# Altium PCB BMS-v1.1.PcbDoc (part 1 of 2)
Units mil, origin at the board's own origin, x right, y up, seen from the top; angles counter-clockwise.
Board outline 1574.8 x 1574.8 mil, 2 copper layers (Top Layer, Bottom Layer), stack 34 mil thick; 76 components, 45 nets, 204 pads, 110 vias.
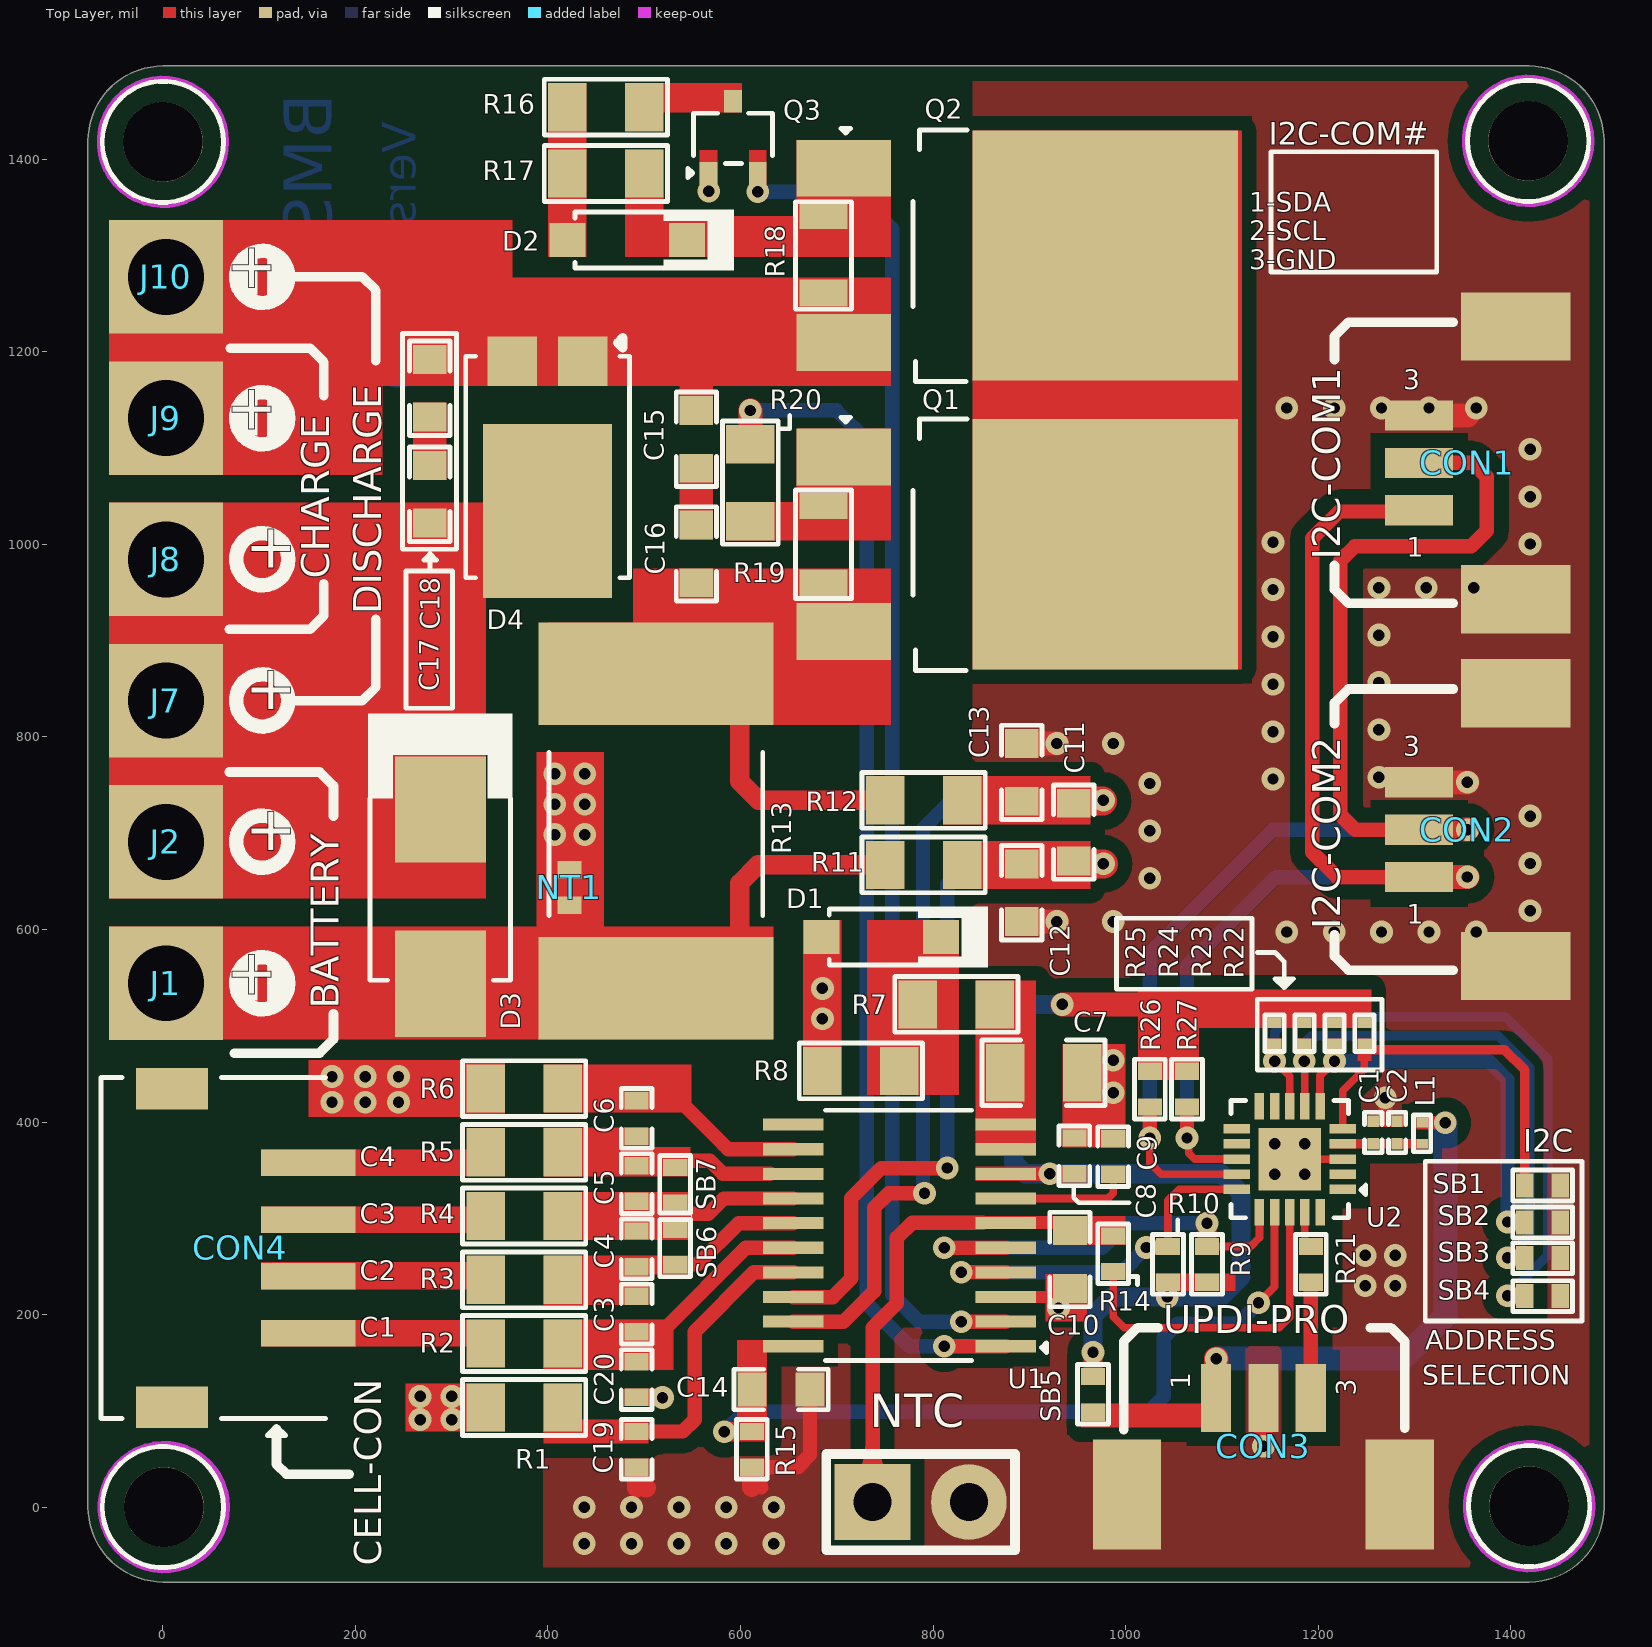
[diagram p0: Top Layer view]
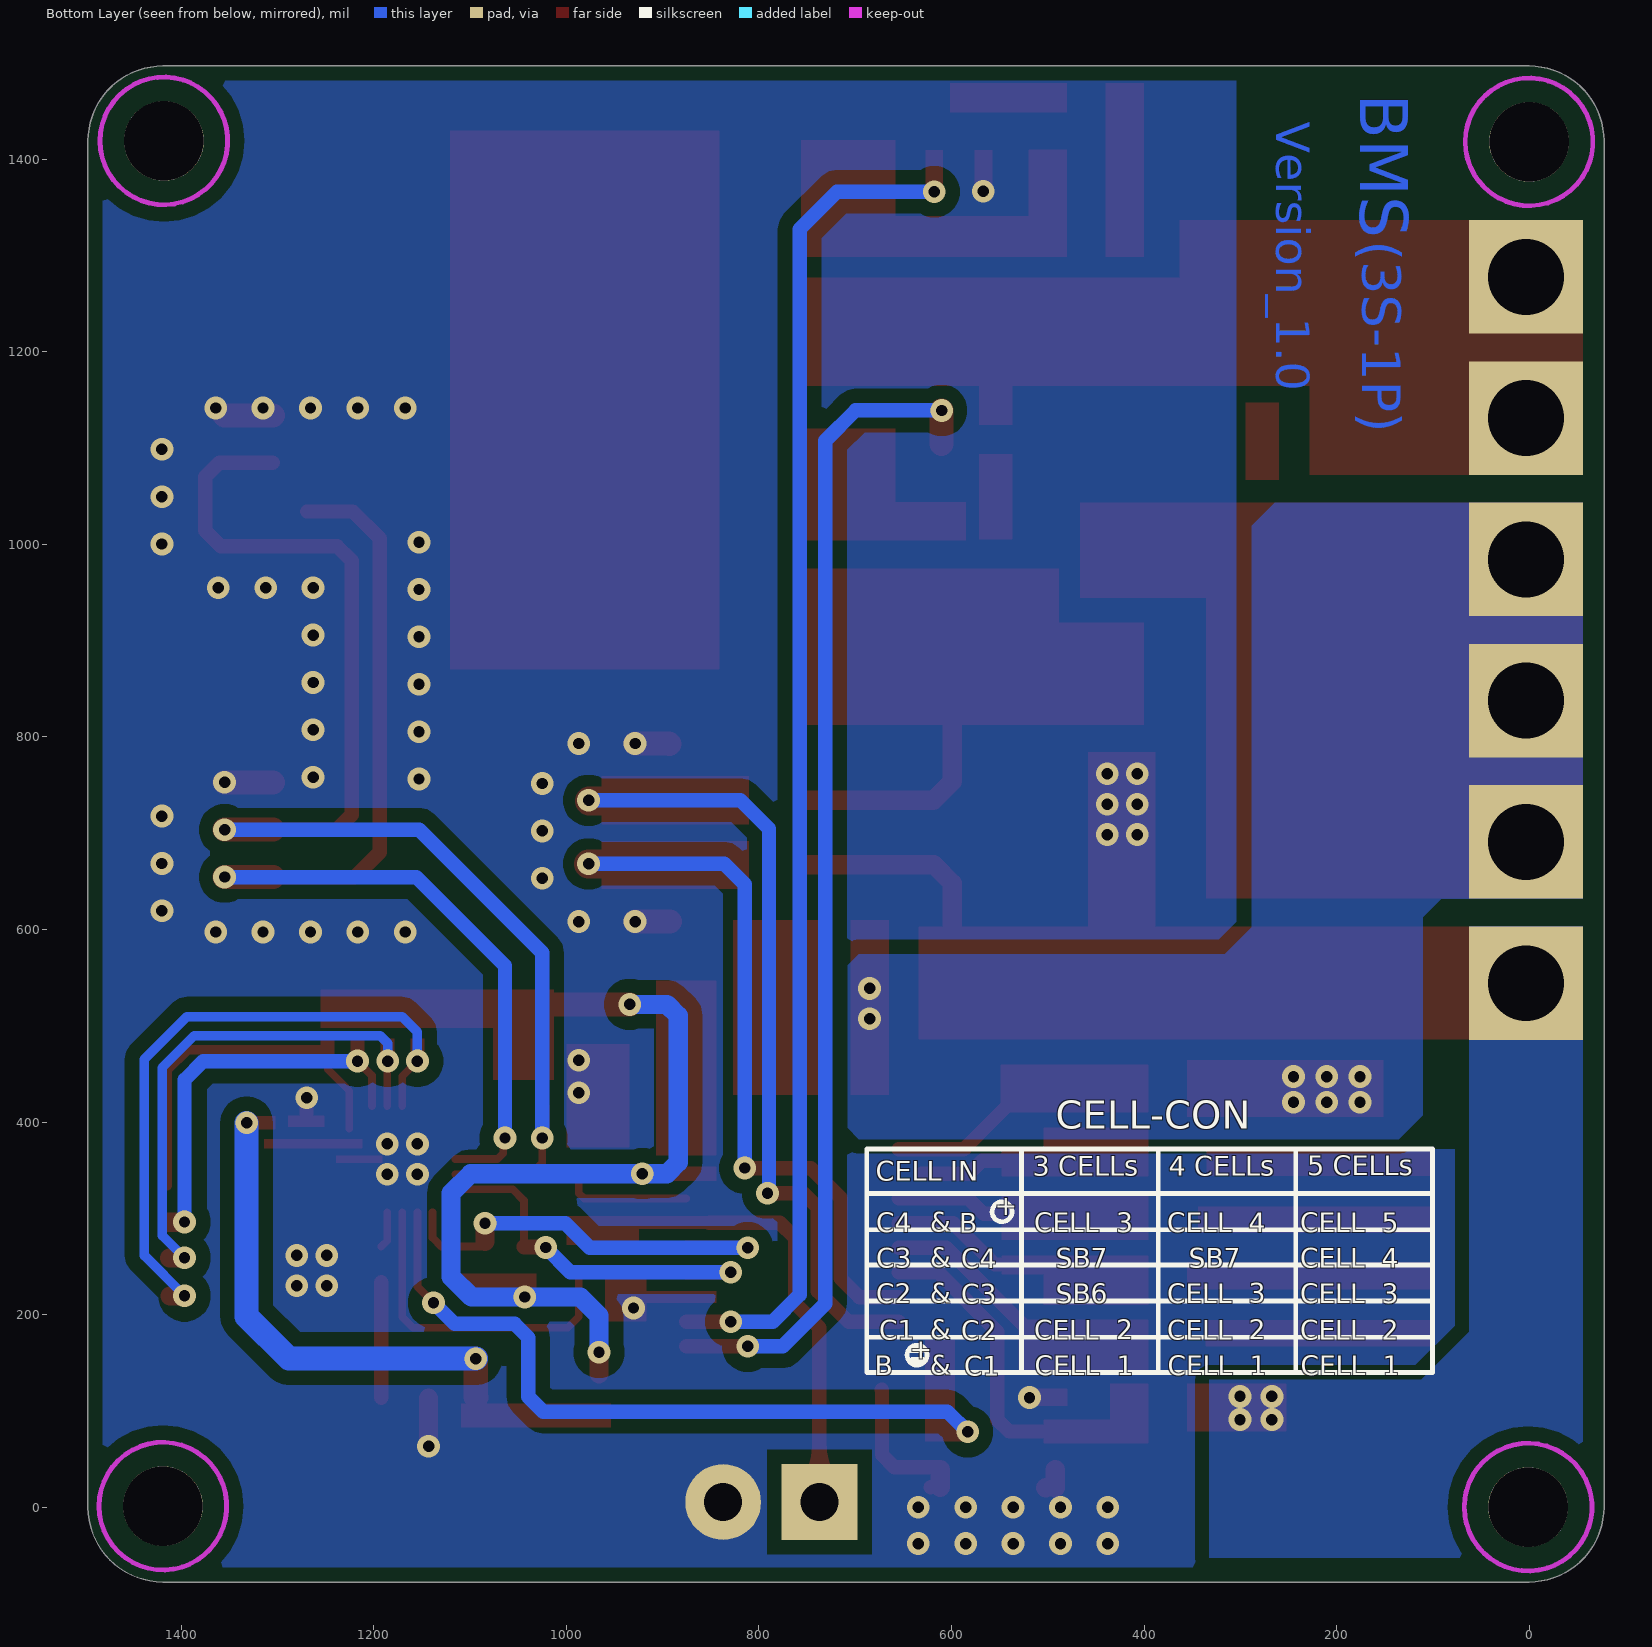
[diagram p1: Bottom Layer view, seen from below]
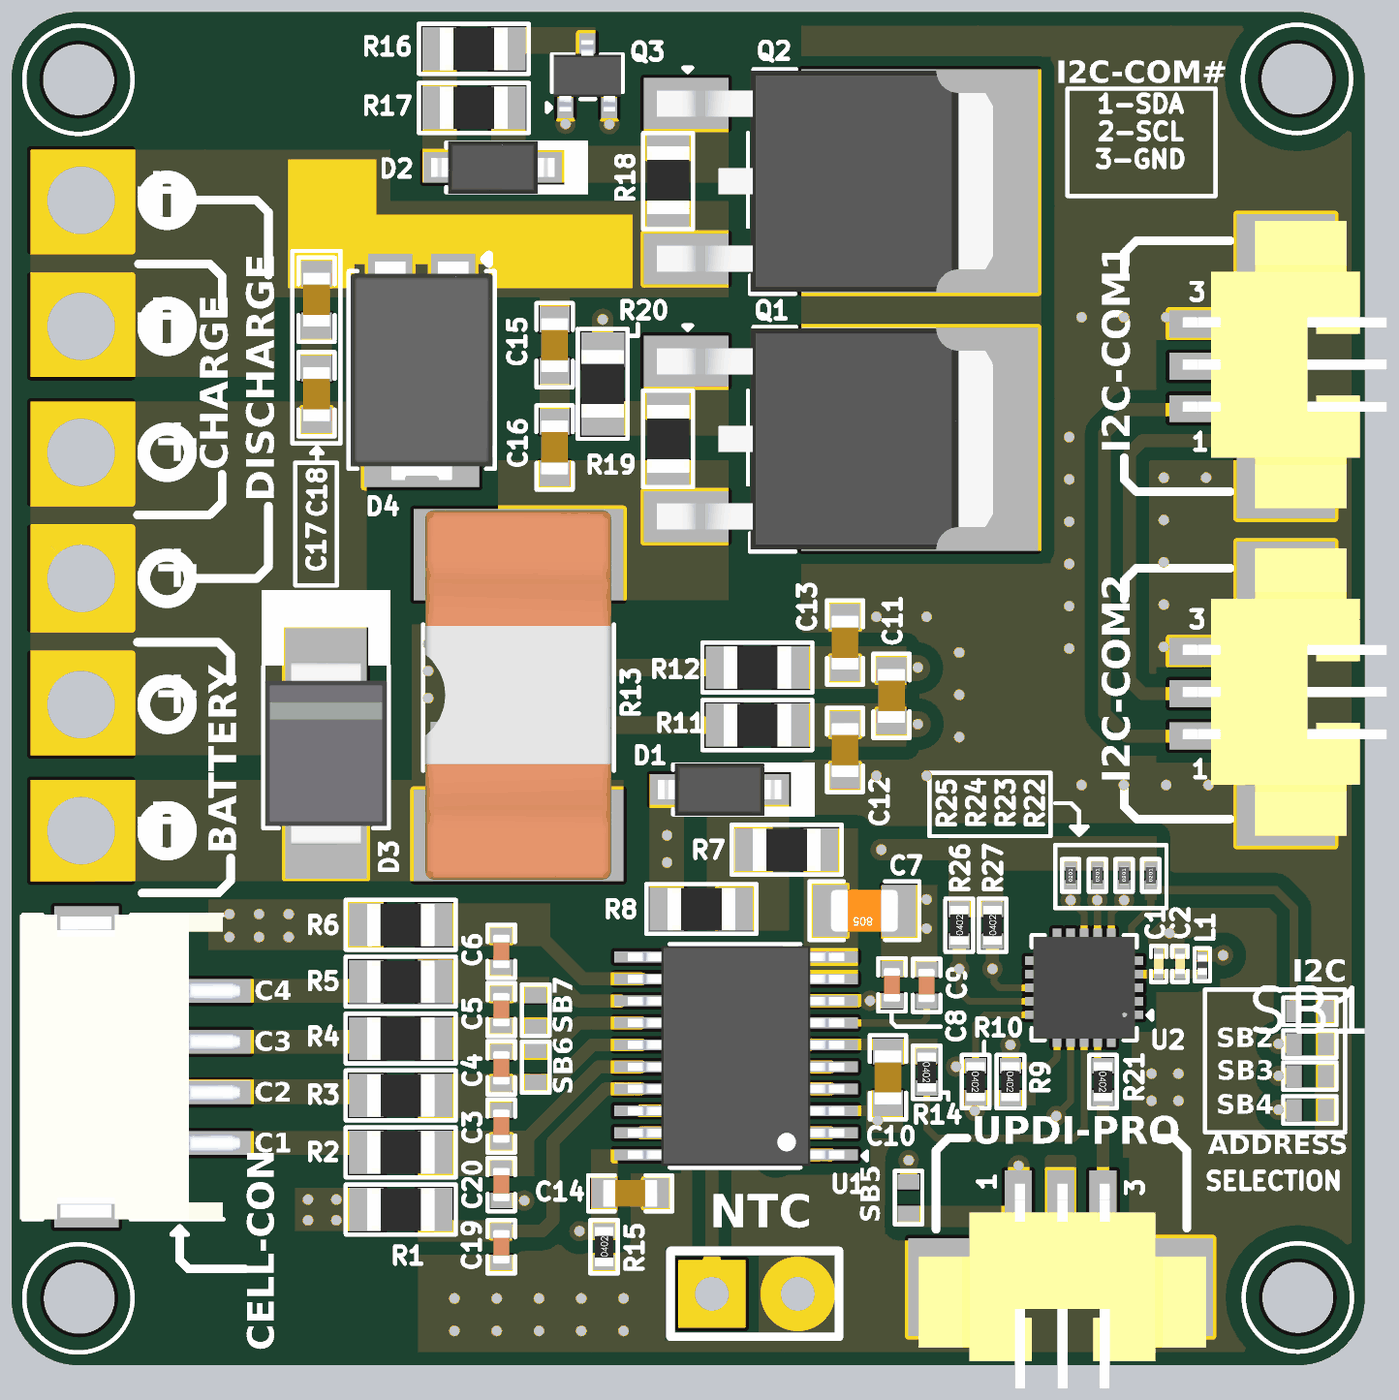
[diagram p2: 3D render of the assembled board from above, using the file's embedded part models]

## Layer stack, top to bottom
Top Solder: solder mask 3, Solder Resist, Dk 3.5
Top Layer: signal copper 9
Dielectric 1: dielectric 16, FR-4, Dk 4.8
Bottom Layer: signal copper 9
Bottom Solder: solder mask 3, Solder Resist, Dk 3.5

## Board outline
-77.8,0 -77.8,1419.2 cw(c0,1419.2) 0,1497 1419.2,1497 cw(c1419.2,1419.2) 1497,1419.2 1497,0 cw(c1419.2,0) 1419.2,-77.8 0,-77.8 cw(c0,0)

## Design rules (kind name [scope] priority, off if disabled: settings)
BoardOutlineClearance [All] p1: gap=0 ignorepadtopadclearanceinfootprint=FALSE except(10: Arc-OutlineEdge Track-OutlineEdge SMDPad-OutlineEdge THPad-OutlineEdge Via-OutlineEdge Fill-OutlineEdge Region-OutlineEdge Text-OutlineEdge; 15: Poly-OutlineEdge)
Clearance [All] p1: gap=10 ignorepadtopadclearanceinfootprint=FALSE except(0: Arc-Hole Track-Hole SMDPad-Hole THPad-Hole Via-Hole Fill-Hole Poly-Hole Region-Hole Text-Hole; 5: Arc-SMDPad Track-SMDPad Track-Fill SMDPad-SMDPad SMDPad-Fill; 6: Track-Via; 7: Arc-Arc Arc-Track Arc-Via Arc-Fill Arc-Region Track-Track Track-Region SMDPad-Via SMDPad-Region THPad-Via Via-Via Fill-Fill Fill-Region Poly-Region Region-Region; 15: Arc-Poly Track-Poly SMDPad-Poly THPad-Poly Via-Poly Fill-Poly Poly-Poly)
ComponentClearance [All] p1: gap=0 collisioncheckmode=3 verticalgap=0 showdistances=FALSE
MinimumSolderMaskSliver [All] p1: minsoldermaskwidth=0
PolygonConnect [All] p1: connectstyle=Direct reliefconductorwidth=10 reliefentries=4 polygonreliefangle="45 Angle" airgapwidth=10
RoutingVias [All] p1: holewidth=11.81 width=23.62 viastyle="Through Hole" minholewidth=11.81 minwidth=23.62 maxholewidth=11.81 maxwidth=23.62
SilkToSilkClearance [All] p1: silktosilkclearance=0
SilkToSolderMaskClearance [IsPad] p1: minsilkscreentomaskgap=0 clearancetoexposedcopper=TRUE
SolderMaskExpansion [All] p1: expansion=4 istentingtop=FALSE
Width [All] p1: maxlimit=100 minlimit=5 preferedwidth=10 minimp=50.000000 maximp=50.000000 favimp=50.000000
26 further rules are at their usual default settings.

## Classes and differential pairs
component class U_BMS-Sheet: 3 C7 C8 C9 C10 C11 C13 C14 C15 C16 D1 D2 NT1 NTC Q1 Q2 Q3 R7 R8 R9 R10 R11 R12 R13 R14 R15 R16 R17 R18 R19 R20 U1
component class U_BMS-Controller-Sheet: C1 C2 CON1 CON2 CON3 L1 R21 R22 R23 R24 R25 R26 R27 SB1 SB2 SB3 SB4 SB5 U2
component class "U_BATTERY PACK-Sheet": C3 C4 C5 C6 C17 C18 C19 C20 CON4 D3 D4 J1 J2 J7 J8 J9 J10 R1 R2 R3 R4 R5 R6 SB6 SB7

## Components (designator, comment, footprint, x,y, rotation, side; value= is the part's Value field where it differs from the comment)
C1 "1uF" CAP-0201 1257.32,389.19 r90 top
C2 "0.1uF" CAP-0201 1282.03,389.19 r90 top
C3 "1uF" Cap-0402 492.18,200.5 r90 top
C4 "1uF" Cap-0402 492.18,268.29 r90 top
C5 "1uF" Cap-0402 492.19,336.06 r90 top
C6 "1uF" Cap-0402 492.19,403.77 r90 top
C7 "2.2uF" Cap-0805 914.8,451.13 r180 top
C8 "4.7uf" Cap-0402 946.86,364.87 r270 top
C9 "1uF" Cap-0402 987.2,364.2 r270 top
C10 "4.7nF" Cap-0603 942.2,257.2 r90 top
C11 "0.1uF" CAP-0603 946.2,701.2 r270 top
C12 "0.1uF" CAP-0603 892.2,638.2 r270 top
C13 "0.1uF" CAP-0603 892.2,763.2 r90 top
C14 "470pF" Cap-0603 642.2,122.2 r180 top
C15 "0.1uF" CAP-0603 554.2,1109.2 r270 top
C16 "0.1uF" CAP-0603 554.2,990.2 r270 top
C17 "0.1uF" CAP-0603 277.2,1052.2 r270 top
C18 "0.1uF" CAP-0603 277.2,1162.2 r270 top
C19 "1uF" Cap-0402 492.2,60.06 r90 top
C20 "1uF" Cap-0402 492.2,132.51 r90 top
CON1 "1.25-3PWB" 1.25-3PWB 1355.1,1084.69 r90 top
CON2 "1.25-3PWB" 1.25-3PWB 1355.1,703.69 r90 top
CON3 "1.25-3PWB" 1.25-3PWB 1143.2,63.2 r0 top locked
CON4 "S4B-ZR-SM4A-TF(LF)(SN)" S4B-ZR-SM4A-TF(LF)(SN) 80.2,269.2 r270 top
D1 "1N4148W-7-F" SOD-123 746.2,592.2 r0 top value=2pF
D2 "1N4148W-7-F" SOD-123 482.2,1316.2 r0 top value=2pF
D3 "SMBJ24A" SMB_ 288.2,634.2 r90 top locked
D4 "SB10100L" SB10100L 436.2,1190.2 r180 top
J1 "Through_Hole_Pad" "Through Hole Pad (High Power)_" 3.2,544.28 r0 top
J2 "Through_Hole_Pad" "Through Hole Pad (High Power)_" 3.2,691.01 r0 top
J7 "Through_Hole_Pad" "Through Hole Pad (High Power)_" 3.2,837.74 r90 top
J8 "Through_Hole_Pad" "Through Hole Pad (High Power)_" 3.2,984.47 r90 top
J9 "Through_Hole_Pad" "Through Hole Pad (High Power)_" 3.2,1131.2 r90 top
J10 "Through_Hole_Pad" "Through Hole Pad (High Power)_" 3.2,1277.93 r90 top
L1 "" "IND 0201" 1308.03,388.19 r270 top
NT1 "Net Tie_SMD" "Net Tie Pad" 422.2,643.7 r90 top net-tie
NTC "2P THrough Hole Pads" "2P THrough Hole Pads" 787.2,5.2 r0 top
Q1 "IPD034N06N3G" TO-252-2L 843.2,1000.2 r270 top
Q2 "IPD034N06N3G" TO-252-2L 843.2,1300.2 r270 top
Q3 "BSS84W-7-F" SOT-323 592.3,1422.86 r0 top
R1 "100R" RES-0805#1 375.25,103.41 r0 top
R2 "100R" RES-0805#1 375.19,169.93 r0 top
R3 "100R" RES-0805#1 375.22,236.14 r0 top
R4 "100R" RES-0805#1 375.19,302.35 r0 top
R5 "100R" RES-0805#1 375.19,368.56 r0 top
R6 "100R" RES-0805#1 375.19,434.69 r0 top
R7 "100R" RES-0805#1 824.2,522.2 r0 top
R8 "10K" RES-0805#1 724.99,453.13 r0 top
R9 "4.7K" Res-0402 1084.64,252.19 r270 top
R10 "4.7K" Res-0402 1044.13,252.19 r270 top
R11 "100R" RES-0805#1 790.2,667.2 r0 top
R12 "100R" RES-0805#1 790.22,734.2 r0 top
R13 "1mΩ" "RES 3920" 512.2,702.2 r90 top locked
R14 "10K" Res-0402 987.2,263.2 r270 top
R15 "499K" Res-0402 611.81,60.06 r90 top
R16 "1K" RES-0805#1 460.2,1454.2 r0 top value=1kR
R17 "1M" RES-0805#1 460.19,1385.39 r180 top value=1MR
R18 "1M" RES-0805#2 686.2,1301.2 r90 top value=1MR
R19 "1M" RES-0805#2 686.2,1000.2 r90 top value=1MR
R20 "0R" Res-0805 610.2,1064.2 r270 top
R21 "4.7K" Res-0402 1192.41,252.19 r270 top
R22 "4.7K" Res-0201 1248.03,492.19 r90 top
R23 "4.7K" Res-0201 1217.03,492.19 r90 top
R24 "4.7K" Res-0201 1186.03,492.19 r90 top
R25 "4.7K" Res-0201 1154.87,492.19 r90 top
R26 "4.7K" Res-0402 1025.2,434.2 r90 top
R27 "4.7K" Res-0402 1063.8,434.2 r90 top
SB1 "Solder Bridge 0402" "Solder Bridge 0402" 1433.2,334.04 r0 top
SB2 "Solder Bridge 0402" "Solder Bridge 0402" 1433.2,295.85 r0 top
SB3 "Solder Bridge 0402" "Solder Bridge 0402" 1433.2,258.65 r0 top
SB4 "Solder Bridge 0402" "Solder Bridge 0402" 1433.2,219.2 r0 top
SB5 "Solder Bridge 0402" "Solder Bridge 0402" 966.2,117.2 r270 top
SB6 "Solder Bridge 0402" "Solder Bridge 0402" 532.2,270.2 r90 top
SB7 "Solder Bridge 0402" "Solder Bridge 0402" 532.2,334.2 r90 top
U1 "BQ7692006PWR" TSSOP-20 765.2,282.2 r180 top locked
U2 "ATTINY1616-MNR" "20-VQFN (3x3)" 1170.54,361.53 r180 top

## Footprints (in the part's own frame and the unit in brackets; to place one, negate y for a bottom-side part, rotate by r counter-clockwise, add the part's x,y. Pads: shape width x height; smd on the part's side, far side on the other; paste and mask are expansions set on the pad)
1.25-3PWB [mm]
  rect 0.8x1.8 smd: 1(-1.25,1.275) 2(0,1.275) 3(1.25,1.275)
  rect 1.8x2.9 smd: MP1(-3.6,-1.275) MP2(3.6,-1.275)
  body extent -4.2,-4.27 4.3,1.78, height 3.5
"2P THrough Hole Pads" [mm]
  rect 2x2 hole 1: 1(-1.27,0)
  round 2 hole 1: 2(1.27,0)
  silkscreen extent -2.49,-1.27 2.49,1.27
"20-VQFN (3x3)" [mm]
  rect 0.7x0.25 smd: 1(-1.4,0.8) 2(-1.4,0.4) 3(-1.4,0) 4(-1.4,-0.4) 5(-1.4,-0.8) 11(1.4,-0.8) 12(1.4,-0.4) 13(1.4,0) 14(1.4,0.4) 15(1.4,0.8)
  rect 0.25x0.7 smd: 6(-0.8,-1.4) 7(-0.4,-1.4) 8(0,-1.4) 9(0.4,-1.4) 10(0.8,-1.4) 16(0.8,1.4) 17(0.4,1.4) 18(0,1.4) 19(-0.4,1.4) 20(-0.8,1.4)
  rect 1.65x1.65 smd: 21(0,0)
  silkscreen extent -2.01,-1.55 1.55,1.55, body extent -1.5,-1.5 1.5,1.5, height 0.59
CAP-0201 [mm]
  rect 0.3x0.3 smd mask+0.055: 1(-0.3,0) 2(0.3,0)
  silkscreen extent -0.53,-0.23 0.53,0.23, body extent -0.3,-0.15 0.3,0.15, height 0.28
Cap-0402 [mil]
  rect 18x25 smd mask+2.36: 1(-18.5,0) 2(18.5,0)
  silkscreen extent -31,-16 31,16, body extent -20,-10 20,10, height 19
Cap-0603 [mil]
  rect 30x35 smd mask+2.36: 1(-30,0) 2(30,0)
  silkscreen extent -49,-21 49,21, body extent -32,-16 31,16, height 34
CAP-0603 [mil]
  rect 30x35 smd mask+2.36: 1(-30,0) 2(30,0)
  silkscreen extent -49,-21 49,21, body extent -32,-16 31,16, height 34
Cap-0805 [mil] "SMD 0805"
  rect 40x60 smd mask+2.76: 1(-40,0) 2(40,0)
  silkscreen extent -64,-34 64,34, body extent -39,-25 39,25, height 30
"IND 0201" [mm]
  rect 0.25x0.3 smd mask+0.055: 1(-0.275,0) 2(0.275,0)
  silkscreen extent -0.48,-0.23 0.48,0.23, body extent -0.3,-0.15 0.3,0.15, height 0.15
"Net Tie Pad" [mil]
  rect 18x25 smd mask-10: 1(-18.5,0) 2(18.5,0)
  Top Layer region: -19.06,-35.94 10.94,-35.94 10.94,34.06 -19.06,34.06
"RES 3920" [mm]
  rect 2.7x6.2 smd: 1(-4.15,0) 2(4.15,0)
  silkscreen extent -2.24,-2.82 2.08,2.82, body extent -5.46,-2.75 5.46,2.77, height 1.99
Res-0201 [mm]
  rect 0.27x0.37 smd mask+0.055: 1(-0.275,0) 2(0.275,0)
  silkscreen extent -0.48,-0.25 0.48,0.25, body extent -0.3,-0.15 0.3,0.15, height 0.29
Res-0402 [mil]
  rect 18x25 smd mask+2.17: 1(-18.5,0) 2(18.5,0)
  silkscreen extent -32,-17 32,16, body extent -23,-11 23,11, height 16
RES-0805#1 [mil] "SMD 0805"
  rect 40x50 smd: 1(-40,0) 2(40,0)
  silkscreen extent -64,-29 64,29, body extent -39,-25 39,24, height 24
RES-0805#2 [mil] "SMD 0805"
  rect 27.56x50 smd: 1(-40,0) 2(40,0)
  silkscreen extent -57,-29 55,29, body extent -39,-25 39,24, height 24
Res-0805 [mil] "SMD 0805"
  rect 40x50 smd: 1(-40,0) 2(40,0)
  silkscreen extent -64,-29 64,29, body extent -39,-25 39,24, height 24
S4B-ZR-SM4A-TF(LF)(SN) [mm]
  rect 0.7x2.5 smd: 1(-2.25,1.8) 2(-0.75,1.8) 3(0.75,1.8) 4(2.25,1.8)
  rect 1.1x1.9 smd: MP1(-4.2,-1.8) MP2(4.2,-1.8)
  silkscreen extent -4.5,-3.67 4.5,2.25, body extent -4.5,-3.76 4.5,2.74, height 3.7
SB10100L [mm]
  rect 1.3x1.3 smd: 1(0,0) 2(1.86,0)
  rect 3.4x4.6 smd: 3(0.93,3.95)
  silkscreen extent -1.23,-0.62 3.09,5.71, body extent -1.17,-0.41 3.03,6.04, height 1.2
SMB_ [mm]
  rect 2.8x2.4 smd: 1(-2.3,0) 2(2.3,0)
  silkscreen extent -2.21,-1.9 4.83,1.91, body extent -2.7,-1.8 2.7,1.8, height 2.3
SOD-123 [mm]
  rect 0.95x0.9 smd: 1(-1.575,0) 2(1.575,0)
  silkscreen extent -1.37,-0.8 2.82,0.8, body extent -1.82,-0.78 1.83,0.78, height 1.5
"Solder Bridge 0402" [mil]
  rect 18x25 smd mask+2.17: 1(-18.5,0) 2(18.5,0)
  silkscreen extent -32,-17 32,16
SOT-323 [mm]
  rect 0.47x0.6 smd: 1(-0.65,-0.95) 2(0.65,-0.95) 3(0,0.95)
  silkscreen extent -1.19,-1.07 1.04,0.64, body extent -1,-1.05 1,1.05, height 1.1
"Through Hole Pad (High Power)_" [mm]
  rect 3x3 hole 2: 1(0,0)
TO-252-2L [mm]
  rect 1.5x2.5 smd: 1(-2.3,-3.45) 3(2.3,-3.45)
  rect 6.6x7 smd: 2(0,3.45)
  silkscreen extent -3.35,-3.53 3.33,-0.2, body extent -3.27,-4.31 3.27,5.63, height 2.34
TSSOP-20 [mm]
  rect 1.6x0.32 smd: 1(-2.8,2.925) 2(-2.8,2.275) 3(-2.8,1.625) 4(-2.8,0.975) 5(-2.8,0.325) 6(-2.8,-0.325) 7(-2.8,-0.975) 8(-2.8,-1.625) 9(-2.8,-2.275) 10(-2.8,-2.925) 11(2.8,-2.925) 12(2.8,-2.275) 13(2.8,-1.625) 14(2.8,-0.975) 15(2.8,-0.325) 16(2.8,0.325) 17(2.8,0.975) 18(2.8,1.625) 19(2.8,2.275) 20(2.8,2.925)
  silkscreen extent -3.88,-3.3 1.95,3.3, body extent -3.2,-3.25 3.2,3.25, height 1.2

## Part data
C1: library part CC0201MRX5R7BB105, "CAP CER 1UF 16V X5R 0201", LCSC Part Number=C5182464, Manufacturer=Yageo, Supplier Part Number=13-CC0201MRX5R7BB105TR-ND, Category="Ceramic Capacitors", Item Type=Capacitor, Manufacturer Part Number=CC0201MRX5R7BB105, RoHS=Yes, Supplier=Digi-Key
C2: library part GRM033C81E104KE14D, "CAP CER 0.1UF 25V X6S 0201", Capacitance=100nF, Case Code (Imperial)=0201, Case Code (Metric)=0603, Dielectric=X6S, Manufacturer=Murata, Max Operating Temperature=105°C, Min Operating Temperature=-55°C, Package Quantity=15000, Supplier Part Number 1=490-10403-1-ND, Tolerance=10%, Voltage Rating=25V, Case/Package=0201, Category="Ceramic Capacitors", ComponentLink1Description=http://www.mouser.com/ds/2/281/c02e-2905.pdf?src-supplier=Mouser, ComponentLink1URL=http://www.mouser.com/ds/2/281/c02e-2905.pdf?src-supplier=Mouser, ComponentLink2Description=http://www.farnell.com/datasheets/2722733.pdf?src-supplier=Farnell, ComponentLink2URL=http://www.farnell.com/datasheets/2722733.pdf?src-supplier=Farnell, ComponentLink3Description=http://search.murata.co.jp/Ceramy/image/img/A01X/G101/ENG/GRM033C81E104KE14-01.pdf?src-supplier=Digi-Key, ComponentLink3URL=http://search.murata.co.jp/Ceramy/image/img/A01X/G101/ENG/GRM033C81E104KE14-01.pdf?src-supplier=Digi-Key, Height=0.3mm, Length=0.024inch, Manufacturer Part Number=GRM033C81E104KE14D, Mount="Surface Mount", Packaging="Tape and Reel", Pricing 1="1=0.10000, 10=0.05100, 50=0.02780, 100=0.02260, 500=0.01616, 1000=0.01270, 2500=0.01155, 5000=0.01063 (USD)", RoHS=Yes, RoHS Compliant=Yes, Stock 1=91, Supplier 1=Digi-Key, Termination=SMD/SMT, Thickness=0.013inch, Voltage Rating (DC)=25V, Weight=1.2E-05oz, Width=0.3mm
C3 C4 C5 C6 C9 C19 C20: library part GRM155R61E105KA12D, "CAP CER 1UF 25V X5R 0402", Case Code (Imperial)=0402, Case Code (Metric)=1005, Dielectric=X5R, LCSC Part Number=C77009, Manufacturer=Murata, Max Operating Temperature=85°C, Min Operating Temperature=-55°C, Package Quantity=10000, Supplier Part Number 1=490-10017-6-ND, Tolerance=10%, Voltage=25V, Capacitance=1uF, Case/Package=0402, ComponentLink1Description=http://www.farnell.com/datasheets/2048341.pdf?src-supplier=Element14, ComponentLink1URL=http://www.farnell.com/datasheets/2048341.pdf?src-supplier=Element14, Depth=0.5mm, Height=0.5mm, Lead Free="Lead Free", Length=1mm, Manufacturer Part Number=GRM155R61E105KA12D, Material=Ceramic, Mount="Surface Mount", Packaging="Tape and Reel", Pricing 1="1=0.11, 10=0.077, 100=0.0363, 500=0.02546, 1000=0.02108, 2500=0.01962, 5000=0.01795 (USD)", REACH SVHC="No SVHC", Stock 1=1150750, Supplier 1=Digi-Key, Termination=SMD/SMT, Thickness=0.022inch, Voltage Rating=25V, Voltage Rating (DC)=25V, Weight=0.000212oz, Width=0.5mm
C7: library part CC0805KKX5R9BB225, "CAP CER 2.2UF 50V X5R 0805", Case Code (Imperial)=0805, Case Code (Metric)=2012, Dielectric=X5R, LCSC Part Number=C326581, Manufacturer=Yageo, Max Operating Temperature=85°C, Min Operating Temperature=-55°C, Package Quantity=3000, Resistor Type=Ceramic, Supplier Part Number 1=603-CC805KKX5R9BB225, Tolerance=10%, Voltage Rating=50V, Case/Package=0805, Category="Ceramic Capacitors", ComponentLink1Description=http://www.mouser.com/ds/2/447/Yageo_UPY-GP_NP0_16V-to-50V_9-358835.pdf?src-supplier=Mouser, ComponentLink1URL=http://www.mouser.com/ds/2/447/Yageo_UPY-GP_NP0_16V-to-50V_9-358835.pdf?src-supplier=Mouser, ComponentLink2Description=http://www.yageo.com/documents/recent/UPY-GPHC_X5R_4V-to-50V_25.pdf?src-supplier=Digi-Key, ComponentLink2URL=http://www.yageo.com/documents/recent/UPY-GPHC_X5R_4V-to-50V_25.pdf?src-supplier=Digi-Key, Halogen Free="Halogen Free", Item Type=Capacitor, Lead Free="Lead Free", Length=0.079inch, Manufacturer Part Number=CC0805KKX5R9BB225, Mounting Technology="Surface Mount", Packaging="Tape and Reel", Pricing 1="1=0.26000, 10=0.12100, 50=0.12100, 100=0.08700, 1000=0.06700, 10000=0.05000 (USD)", RoHS=Yes, RoHS Compliant=Yes, Stock 1=3880, Supplier 1=Mouser, Termination=SMD/SMT, Thickness=0.057inch, Voltage Rating (DC)=50V, Weight=0.000194oz, Width=1.25mm
C8: library part EDK105BBJ475MVLF, "16V 4.7uF ±20% 0402 Multilayer Ceramic Capacitors", LCSC Part Number=C412302, Manufacturer="Taiyo Yuden", ComponentLink1Description=LCSC, ComponentLink1URL=https://www.lcsc.com/product-detail/Multilayer-Ceramic-Capacitors-MLCC-SMD-SMT_Taiyo-Yuden-EDK105BBJ475MVLF_C412302.html, Item Type=Capacitor, Manufacturer Part Number=EDK105BBJ475MVLF
C10: library part CC0603JRNPO9BN472, "CAP CER 4700PF 50V C0G/NPO 0603", LCSC Part Number=C576818, Manufacturer=Yageo, Supplier Part Number 1=13-CC0603JRNPO9BN472CT-ND, Category="Ceramic Capacitors", ComponentLink1Description=LCSC, ComponentLink1URL=https://www.lcsc.com/product-detail/Multilayer-Ceramic-Capacitors-MLCC-SMD-SMT_YAGEO-CC0603JRNPO9BN472_C576818.html, Item Type=Capacitor, Manufacturer Part Number=CC0603JRNPO9BN472, Pricing 1="1=0.48000, 10=0.33000, 50=0.23100, 100=0.19800, 500=0.14854, 1000=0.12543 (USD)", RoHS=Yes, RoHS Compliant=Yes, Stock 1=31779, Supplier 1=Digi-Key
C11 C12 C13 C15 C16 C17 C18: library part CL10B104KB8NNNL, "CAP CER 0.1UF 50V X7R 0603", Capacitance=100nF, Case/Package=0603, Dielectric=X7R, LCSC Part Number=C913912, Manufacturer=Samsung, Max Operating Temperature=125°C, Min Operating Temperature=-55°C, Package Quantity=15000, Supplier Part Number 1=1276-CL10B104KB8NNNLCT-ND, Tolerance=10%, Voltage Rating=50V, ComponentLink1Description=https://www.verical.com/server-webapp/html/getDatasheet?partID=357523&src-supplier=Verical, ComponentLink1URL=https://www.verical.com/server-webapp/html/getDatasheet?partID=357523&src-supplier=Verical, ComponentLink2Description=https://media.digikey.com/pdf/Data%20Sheets/Samsung%20PDFs/CL_Series_MLCC_ds.pdf?src-supplier=Digi-Key, ComponentLink2URL=https://media.digikey.com/pdf/Data%20Sheets/Samsung%20PDFs/CL_Series_MLCC_ds.pdf?src-supplier=Digi-Key, Construction=Flat, Depth=0.8mm, Height=0.8mm, Item Type=Capacitor, Length=1.6mm, Manufacturer Part Number=CL10B104KB8NNNL, Mount="Surface Mount", Packaging="Tape and Reel", Pricing 1="1=0.1, 10=0.03, 50=0.0164, 100=0.0134, 500=0.00958, 1000=0.00753, 2500=0.00684, 5000=0.0063 (USD)", Radiation Hardening=No, RoHS Compliant=Yes, Series=CL, Stock 1=3731229, Supplier 1=Digi-Key, Thickness=0.035inch, Voltage Rating (DC)=50V, Width=0.031inch
C14: library part 0603B471K500CT, "CAP CER 470PF 50V X7R 0603", Case Code (Imperial)=0603, Case Code (Metric)=1608, Case/Package=Ceramic, Dielectric=X7R, LCSC Part Number=C93192, Manufacturer="Walsin Technologies", Max Operating Temperature=125°C, Min Operating Temperature=-55°C, Tolerance=10%, Voltage Rating=50V, Capacitance=470pF, Category="Ceramic Capacitors", ComponentLink1Description=https://www.verical.com/server-webapp/html/getDatasheet?partID=467798&src-supplier=Verical, ComponentLink1URL=https://www.verical.com/server-webapp/html/getDatasheet?partID=467798&src-supplier=Verical, ComponentLink2Description=http://www.farnell.com/datasheets/2340522.pdf?src-supplier=Farnell, ComponentLink2URL=http://www.farnell.com/datasheets/2340522.pdf?src-supplier=Farnell, ComponentLink3Description=http://www.passivecomponent.com/indexsea/0603B471K500CT-IS.pdf?src-supplier=Digi-Key, ComponentLink3URL=http://www.passivecomponent.com/indexsea/0603B471K500CT-IS.pdf?src-supplier=Digi-Key, ComponentLink4Description=http://www.passivecomponent.com/wp-content/uploads/2018/10/MLCC.pdf?src-supplier=Digi-Key, ComponentLink4URL=http://www.passivecomponent.com/wp-content/uploads/2018/10/MLCC.pdf?src-supplier=Digi-Key, ComponentLink5Description=http://www.farnell.com/datasheets/1958513.pdf?src-supplier=Element14, ComponentLink5URL=http://www.farnell.com/datasheets/1958513.pdf?src-supplier=Element14, ComponentLink6Description=http://www.farnell.com/datasheets/2340522.pdf?src-supplier=Newark, ComponentLink6URL=http://www.farnell.com/datasheets/2340522.pdf?src-supplier=Newark, Depth=0.8mm, Item Type=Capacitor, Lead Free="Lead Free", Length=1.6mm, Manufacturer Part Number=0603B471K500CT, Packaging="Tape and Reel", Pricing 1="4000=0.00550, 8000=0.00460, 12000=0.00440, 40000=0.00430 (USD)", Radiation Hardening=No, REACH SVHC=Unknown, RoHS=Yes, RoHS Compliant=Yes, Stock 1=136000, Supplier 1="Arrow Electronics", Supplier Part Number 1=0603B471K500CT, Voltage Rating (DC)=50V
CON1 CON2 CON3: "1x3P 1 1.25mm Male pin 3 -40℃~+85℃ Surface Mount SMD,P=1.25mm Wire To Board / Wire To Wire Connector ROHS", LCSC Part Number=C2905010, Manufacturer=DEALON, Package=Custom, ComponentLink1Description=LCSC, ComponentLink1URL=https://www.lcsc.com/product-detail/Wire-To-Board-Wire-To-Wire-Connector_DEALON-1-25-3PWB_C2905010.html, Item Type="Right Angle JST", Manufacturer Part Number=1.25-3PWB
CON4: "CONN HEADER SMD R/A 4POS 1.5MM", LCSC Part Number=C485354, Manufacturer=JST, Category="Headers and Wire Housings", ComponentLink1Description=https://datasheet.ciiva.com/25618/0900766b81147f94-25618478.pdf?src-supplier=Rs, ComponentLink1URL=https://datasheet.ciiva.com/25618/0900766b81147f94-25618478.pdf?src-supplier=Rs, ComponentLink2Description=https://datasheet.ciiva.com/26894/getdatasheetpartid-646289-26894627.pdf?src-supplier=Verical, ComponentLink2URL=https://datasheet.ciiva.com/26894/getdatasheetpartid-646289-26894627.pdf?src-supplier=Verical, ComponentLink3Description=https://datasheet.ciiva.com/26894/getdatasheetpartid-558977-26894928.pdf?src-supplier=Verical, ComponentLink3URL=https://datasheet.ciiva.com/26894/getdatasheetpartid-558977-26894928.pdf?src-supplier=Verical, ComponentLink4Description=https://datasheet.ciiva.com/6832/ezh-6832478.pdf?src-supplier=Digi-Key, ComponentLink4URL=https://datasheet.ciiva.com/6832/ezh-6832478.pdf?src-supplier=Digi-Key, Item Type="Wire To Board Connector", Manufacturer Part Number=S4B-ZR-SM4A-TF(LF)(SN), Pricing="1000=0.3597, 2000=0.3278, 5000=0.3171, 10000=0.2956, 25000=0.2849, 50000=0.2848 (USD)", RoHS=Yes, Stock=115000, Supplier="Arrow Electronics", Supplier Part Number=S4B-ZR-SM4A-TF(LF)(SN)
D1 D2: "DIODE GEN PURP 100V 300MA SOD123", Average Rectified Current=300mA, Current Rating=150mA, Forward Voltage=1.25V, LCSC Part Number=C83528, Manufacturer=Diodes, Max Forward Surge Current (Ifsm)=2A, Max Operating Temperature=150°C, Max Repetitive Reverse Voltage (Vrrm)=100V, Max Reverse Current=1uA, Min Operating Temperature=-65°C, Package Quantity=3000, Power Dissipation=400mW, Supplier Part Number 1=7634694, Voltage Rating (DC)=75V, Category="Rectifier Diodes", ComponentLink1Description=https://datasheet.ciiva.com/1179/1915529-1179304.pdf?src-supplier=Element14, ComponentLink1URL=https://datasheet.ciiva.com/1179/1915529-1179304.pdf?src-supplier=Element14, ComponentLink2Description=https://datasheet.ciiva.com/22695/1915529-22695239.pdf?src-supplier=Element14, ComponentLink2URL=https://datasheet.ciiva.com/22695/1915529-22695239.pdf?src-supplier=Element14, ComponentLink3Description=https://datasheet.ciiva.com/8300/ds30086-8300392.pdf?src-supplier=Avnet, ComponentLink3URL=https://datasheet.ciiva.com/8300/ds30086-8300392.pdf?src-supplier=Avnet, ComponentLink4Description=https://datasheet.ciiva.com/15219/getdatasheetpartid-110030-15219548.pdf?src-supplier=Verical, ComponentLink4URL=https://datasheet.ciiva.com/15219/getdatasheetpartid-110030-15219548.pdf?src-supplier=Verical, ComponentLink5Description=https://datasheet.ciiva.com/8303/ds30086-8303197.pdf?src-supplier=Avnet, ComponentLink5URL=https://datasheet.ciiva.com/8303/ds30086-8303197.pdf?src-supplier=Avnet, ComponentLink6Description=https://datasheet.ciiva.com/911/ds30086-911735.pdf?src-supplier=Digi-Key, ComponentLink6URL=https://datasheet.ciiva.com/911/ds30086-911735.pdf?src-supplier=Digi-Key, ComponentLink7Description=https://datasheet.ciiva.com/911/ds30086-911736.pdf?src-supplier=Digi-Key, ComponentLink7URL=https://datasheet.ciiva.com/911/ds30086-911736.pdf?src-supplier=Digi-Key, ComponentLink8Description=https://datasheet.ciiva.com/911/ds30086-911734.pdf?src-supplier=Digi-Key, ComponentLink8URL=https://datasheet.ciiva.com/911/ds30086-911734.pdf?src-supplier=Digi-Key, ComponentLink9Description=https://datasheet.ciiva.com/4435/ds30086-4435128.pdf?src-supplier=Mouser, ComponentLink9URL=https://datasheet.ciiva.com/4435/ds30086-4435128.pdf?src-supplier=Mouser, Contact Plating=Tin,Matte, Element Configuration=Single, Forward Current=150mA, Height=1.25mm, Item Type=Diode, Lead Free="Lead Free", Length=2.85mm, Manufacturer Part Number=1N4148W-7-F, Max Reverse Voltage (DC)=100V, Max Surge Current=2A, Mounting Technology="Surface Mount", Output Current=150mA, Packaging="Tape and Reel", Peak Non-Repetitive Surge Current=2A, Pins=2, Polarity=Standard, Power Rating=400mW, Pricing 1="3000=0.01840, 12000=0.01760, 45000=0.01690, 120000=0.01640, 300000=0.01560 (USD)", Radiation Hardening=No, Reach SVHC Compliant=Yes, Recovery Time=4ns, Reverse Recovery Time=4ns, Reverse Recovery Time-Max=4ns, RoHS=Yes, RoHS Compliant=Yes, Series=-, Stock 1=32931000, Supplier 1="Future Electronics", Voltage=100V, Weight=0.000353oz, Width=1.7mm
D3: "SMB(DO-214AA)", LCSC Part Number=C493201, Manufacturer=SMC, Item Type="TVS Diode", Manufacturer Part Number=SMBJ24A, Package=SMB(DO-214AA)
D4: "TO-277 Schottky Barrier Diodes (SBD) ROHS", LCSC Part Number=C5240369, Manufacturer=TWGMC, Package=TO-277, ComponentLink1Description=LCSC, ComponentLink1URL=https://www.lcsc.com/product-detail/Schottky-Barrier-Diodes-SBD_TWGMC-SB10100L_C5240369.html, Item Type=Diode, Manufacturer Part Number=SB10100L
J1 J2 J7 J8 J9 J10 NTC: "Wire Connecting Pad"
  NTC: Item Type="THrough Hole Pads", Manufacturer Part Number="2P THrough Hole Pads"
L1: library part MMZ0603S601CT000, "FERRITE BEAD 600 OHM 0201 1LN", Case Code (Imperial)=0201, Case Code (Metric)=0603, Current Rating=100mA, DC Resistance (DCR)=1.45R, Manufacturer=TDK, Package Quantity=15000, Supplier Part Number 1=445-2146-1-ND, Tolerance=25%, Case/Package=0201, Category=Inductors, ComponentLink1Description=https://datasheet.ciiva.com/46381/1795294-46381669.pdf?src-supplier=Element14, ComponentLink1URL=https://datasheet.ciiva.com/46381/1795294-46381669.pdf?src-supplier=Element14, ComponentLink2Description=https://datasheet.ciiva.com/46634/beads-commercial-signal-mmz-en-46634390.pdf?src-supplier=Digi-Key, ComponentLink2URL=https://datasheet.ciiva.com/46634/beads-commercial-signal-mmz-en-46634390.pdf?src-supplier=Digi-Key, ComponentLink3Description=https://datasheet.ciiva.com/48682/beads-commercial-signal-mmz-en-48682603.pdf?src-supplier=Avnet, ComponentLink3URL=https://datasheet.ciiva.com/48682/beads-commercial-signal-mmz-en-48682603.pdf?src-supplier=Avnet, ComponentLink4Description=https://datasheet.ciiva.com/46634/beads-commercial-signal-mmz-en-46634381.pdf?src-supplier=Digi-Key, ComponentLink4URL=https://datasheet.ciiva.com/46634/beads-commercial-signal-mmz-en-46634381.pdf?src-supplier=Digi-Key, Core Material=Ferrite, Height=0.013inch, Impedance=600R, Lead Free="Lead Free", Length=0.024inch, Manufacturer Part Number=MMZ0603S601CT000, Max DC Current=100mA, Mount="Surface Mount", Packaging="Cut Tape", Pricing 1="1=0.12000, 10=0.09900, 25=0.07680, 50=0.06380, 100=0.05500, 250=0.04400, 500=0.03960, 1000=0.03300, 5000=0.03080 (USD)", REACH SVHC="No SVHC", RoHS=Yes, RoHS Compliant=Yes, Stock 1=1540, Supplier 1=Digi-Key, Width=0.012inch
NT1: "Net Tie SMD", Manufacturer Part Number="Net Tie", Item Type="Net Tie Pad"
Q1 Q2: "MOSFET N-CH 60V 100A TO252-3", LCSC Part Number=C94897, Manufacturer=Infineon, Supplier Part Number=726-IPD034N06N3G, Item Type=Mosfet, Manufacturer Part Number=IPD034N06N3G, Pricing="1=1.76, 10=1.48, 50=1.48, 100=1.2, 1000=0.837, 10000=0.747 (USD)", RoHS=Yes, Stock=7587, Supplier=Mouser
Q3: "MOSFET P-CH 50V 130MA SOT323", LCSC Part Number=C110490, Manufacturer=Diodes, Supplier Part Number=3204492, Category=MOSFETs, ComponentLink1Description=https://datasheet.ciiva.com/17082/bss84w-7-f-17082780.pdf?src-supplier=Allied+Electronics, ComponentLink1URL=https://datasheet.ciiva.com/17082/bss84w-7-f-17082780.pdf?src-supplier=Allied+Electronics, ComponentLink2Description=https://datasheet.ciiva.com/15137/getdatasheetpartid-91759-15137729.pdf?src-supplier=Verical, ComponentLink2URL=https://datasheet.ciiva.com/15137/getdatasheetpartid-91759-15137729.pdf?src-supplier=Verical, ComponentLink3Description=https://datasheet.ciiva.com/19479/1539489-19479838.pdf?src-supplier=Jameco, ComponentLink3URL=https://datasheet.ciiva.com/19479/1539489-19479838.pdf?src-supplier=Jameco, ComponentLink4Description=https://datasheet.ciiva.com/4442/ds30205-79185-4442986.pdf?src-supplier=Mouser, ComponentLink4URL=https://datasheet.ciiva.com/4442/ds30205-79185-4442986.pdf?src-supplier=Mouser, ComponentLink5Description=https://datasheet.ciiva.com/8115/ds30205-8115434.pdf?src-supplier=Avnet, ComponentLink5URL=https://datasheet.ciiva.com/8115/ds30205-8115434.pdf?src-supplier=Avnet, ComponentLink6Description=https://datasheet.ciiva.com/934/ds30205-934605.pdf?src-supplier=Digi-Key, ComponentLink6URL=https://datasheet.ciiva.com/934/ds30205-934605.pdf?src-supplier=Digi-Key, ComponentLink7Description=https://datasheet.ciiva.com/934/ds30205-934606.pdf?src-supplier=Digi-Key, ComponentLink7URL=https://datasheet.ciiva.com/934/ds30205-934606.pdf?src-supplier=Digi-Key, ComponentLink8Description=https://datasheet.ciiva.com/934/ds30205-934607.pdf?src-supplier=Digi-Key, ComponentLink8URL=https://datasheet.ciiva.com/934/ds30205-934607.pdf?src-supplier=Digi-Key, ComponentLink9Description=https://datasheet.ciiva.com/1190/ds30205-1190308.pdf?src-supplier=Element14, ComponentLink9URL=https://datasheet.ciiva.com/1190/ds30205-1190308.pdf?src-supplier=Element14, ComponentLink10Description=https://datasheet.ciiva.com/8115/ds30205-8115325.pdf?src-supplier=Avnet, ComponentLink10URL=https://datasheet.ciiva.com/8115/ds30205-8115325.pdf?src-supplier=Avnet, Item Type=Mosfet, Manufacturer Part Number=BSS84W-7-F, Pricing="3000=0.415, 9000=0.405, 30000=0.39, 60000=0.385, 120000=0.375 (USD)", RoHS=Yes, Stock=1359000, Supplier="Future Electronics"
R1 R2 R3 R4 R5 R6 R7 R11 R12: library part AC0805FR-07100RL, "RES SMD 100 OHM 1% 1/8W 0805", LCSC Part Number=C138274, Manufacturer=Yageo, Supplier Part Number=6087312, Category="Chip SMD Resistors", ComponentLink1Description=https://datasheet.ciiva.com/12656/pyu-ac-51-rohs-l-2-12656967.pdf?src-supplier=Mouser, ComponentLink1URL=https://datasheet.ciiva.com/12656/pyu-ac-51-rohs-l-2-12656967.pdf?src-supplier=Mouser, Item Type=Resistor, Manufacturer Part Number=AC0805FR-07100RL, Pricing="5000=0.0032, 25000=0.003, 125000=0.0028, 375000=0.0027, 1000000=0.0025 (USD)", RoHS=Yes, Stock=70000, Supplier="Future Electronics"
R8: library part RC0805FR-7W10KL, "RES 10K OHM 1% 1/4W 0805", LCSC Part Number=C723404, Manufacturer=Yageo, Supplier Part Number=49AK3472, Category="Chip SMD Resistors", Item Type=Resistor, Manufacturer Part Number=RC0805FR-7W10KL, Pricing="1=0.153, 25=0.038, 50=0.03, 100=0.02 (USD)", RoHS=Yes, Stock=5000, Supplier=Avnet
R9 R10 R21 R26 R27: library part RC0402FR-074K7L, "RES 4.7K OHM 1% 1/16W 0402", Case Code (Imperial)=0402, Case Code (Metric)=1005, LCSC Part Number=C105871, Manufacturer=Yageo, Max Operating Temperature=155°C, Max Power Dissipation=63mW, Min Operating Temperature=-55°C, Power Rating=62.5mW, Resistance=4.7kR, Resistance Tolerance=1%, Resistor Type="Thick Film", Temperature Coefficient=100ppm/°C, Voltage Rating=50V, Case/Package=0402, Category="Chip SMD Resistors", ComponentLink1Description=https://datasheet.ciiva.com/22661/1686128-22661342.pdf?src-supplier=Element14, ComponentLink1URL=https://datasheet.ciiva.com/22661/1686128-22661342.pdf?src-supplier=Element14, ComponentLink2Description=https://datasheet.ciiva.com/7850/1018594-7850022.pdf?src-supplier=Element14, ComponentLink2URL=https://datasheet.ciiva.com/7850/1018594-7850022.pdf?src-supplier=Element14, ComponentLink3Description=https://datasheet.ciiva.com/7850/1018594-7850023.pdf?src-supplier=Element14, ComponentLink3URL=https://datasheet.ciiva.com/7850/1018594-7850023.pdf?src-supplier=Element14, ComponentLink4Description=https://datasheet.ciiva.com/15215/getdatasheetpartid-328119-15215035.pdf?src-supplier=Verical, ComponentLink4URL=https://datasheet.ciiva.com/15215/getdatasheetpartid-328119-15215035.pdf?src-supplier=Verical, Construction=Rectangular, Depth=0.5mm, Features="Moisture Resistant", Height=0.32mm, Height - Seated (Max)=0.016inch, Item Type=Resistor, Lead Free="Lead Free", Length=1mm, Manufacturer Part Number=RC0402FR-074K7L, Military Standard=Not, Number of Pins=2, Number of Terminations=2, Packaging="Tape and Reel", Pricing 1="10000=0.00085 (USD)", Reach SVHC Compliant=Yes, RoHS=Yes, RoHS Compliant=Yes, Series=RC, Size Code=0402, Stock 1=2420000, Supplier 1=Avnet, Supplier Part Number 1=RC0402FR-074K7L, Termination=SMD/SMT, Tolerance=1%, Voltage Rating (DC)=50V, Width=0.5mm
R13: library part HoLRS3920-3W-1mR-1%, "3W ±1% 1mΩ 3920 Chip Resistor - Surface Mount ROHS", LCSC Part Number=C5336202, Manufacturer=Milliohm, Package=3920, ComponentLink1Description=LCSC, ComponentLink1URL=C5336202, Item Type=Resistor, Manufacturer Part Number=HoLRS3920-3W-1mR-1%
R14: library part RC0402FR-0710KL, "RES 10K OHM 1% 1/16W 0402", Case Code (Imperial)=0402, Case Code (Metric)=1005, LCSC Part Number=C60490, Manufacturer=Yageo, Max Operating Temperature=155°C, Max Power Dissipation=63mW, Min Operating Temperature=-55°C, Power Rating=62.5mW, Resistance=10kR, Resistance Tolerance=1%, Resistor Type="Thick Film", Supplier Part Number 1=603-RC0402FR-0710KL, Temperature Coefficient=100ppm/°C, Voltage Rating=50V, Case/Package=0402, Category="Chip SMD Resistors", ComponentLink1Description=https://datasheet.ciiva.com/7660/38568-7660787.pdf?src-supplier=Element14, ComponentLink1URL=https://datasheet.ciiva.com/7660/38568-7660787.pdf?src-supplier=Element14, ComponentLink2Description=https://datasheet.ciiva.com/7849/1686128-7849814.pdf?src-supplier=Element14, ComponentLink2URL=https://datasheet.ciiva.com/7849/1686128-7849814.pdf?src-supplier=Element14, ComponentLink3Description=https://datasheet.ciiva.com/7983/1018594-7983486.pdf?src-supplier=Element14, ComponentLink3URL=https://datasheet.ciiva.com/7983/1018594-7983486.pdf?src-supplier=Element14, ComponentLink4Description=https://datasheet.ciiva.com/22747/1018594-22747512.pdf?src-supplier=Element14, ComponentLink4URL=https://datasheet.ciiva.com/22747/1018594-22747512.pdf?src-supplier=Element14, ComponentLink5Description=https://datasheet.ciiva.com/12667/pyu-rc0402-51-rohs-l-6-r-12667067.pdf?src-supplier=Mouser, ComponentLink5URL=https://datasheet.ciiva.com/12667/pyu-rc0402-51-rohs-l-6-r-12667067.pdf?src-supplier=Mouser, ComponentLink6Description=https://datasheet.ciiva.com/7849/1784430-7849813.pdf?src-supplier=Element14, ComponentLink6URL=https://datasheet.ciiva.com/7849/1784430-7849813.pdf?src-supplier=Element14, ComponentLink7Description=https://datasheet.ciiva.com/7849/1784430-7849815.pdf?src-supplier=Element14, ComponentLink7URL=https://datasheet.ciiva.com/7849/1784430-7849815.pdf?src-supplier=Element14, Construction=Rectangular, Depth=0.5mm, Features="Moisture Resistant", Height=0.32mm, Item Type=Resistor, Lead Free="Lead Free", Lead Pitch=0.2mm, Length=1mm, Manufacturer Part Number=RC0402FR-0710KL, Military Standard=Not, Number of Pins=2, Number of Terminations=2, Packaging="Tape and Reel", Pricing 1="1=0.10000, 10=0.01400, 50=0.01400, 100=0.00500, 1000=0.00300, 10000=0.00200 (USD)", REACH SVHC="No SVHC", RoHS=Yes, RoHS Compliant=Yes, Series=RC, Stock 1=18648329, Supplier 1=Mouser, Termination=SMD/SMT, Tolerance=1%, Voltage Rating (DC)=50V, Width=0.5mm, Working Voltage=50V
R15: library part RC0402FR-07499KL, "RES 499K OHM 1% 1/16W 0402", Case Code (Imperial)=0402, Case Code (Metric)=1005, LCSC Part Number=C137971, Manufacturer=Yageo, Max Operating Temperature=155°C, Max Power Dissipation=63mW, Min Operating Temperature=-55°C, Package Quantity=1, Power Rating=62.5mW, Resistance=499kR, Resistor Type="Thick Film", Supplier Part Number 1=603-RC0402FR-07499KL, Temperature Coefficient=100ppm/°C, Tolerance=1%, Voltage Rating=50V, Case/Package=0402, Category="Chip SMD Resistors", ComponentLink1Description=https://datasheet.ciiva.com/2491/pyu-r-int-thick-7-2491265.pdf?src-supplier=Digi-Key, ComponentLink1URL=https://datasheet.ciiva.com/2491/pyu-r-int-thick-7-2491265.pdf?src-supplier=Digi-Key, ComponentLink2Description=https://datasheet.ciiva.com/2491/pyu-r-int-thick-7-2491266.pdf?src-supplier=Digi-Key, ComponentLink2URL=https://datasheet.ciiva.com/2491/pyu-r-int-thick-7-2491266.pdf?src-supplier=Digi-Key, ComponentLink3Description=https://datasheet.ciiva.com/2491/pyu-r-int-thick-7-2491264.pdf?src-supplier=Digi-Key, ComponentLink3URL=https://datasheet.ciiva.com/2491/pyu-r-int-thick-7-2491264.pdf?src-supplier=Digi-Key, ComponentLink4Description=https://datasheet.ciiva.com/5558/pyu-rc0402-51-rohs-l-6-r-5558345.pdf?src-supplier=Mouser, ComponentLink4URL=https://datasheet.ciiva.com/5558/pyu-rc0402-51-rohs-l-6-r-5558345.pdf?src-supplier=Mouser, ComponentLink5Description=https://datasheet.ciiva.com/15189/getdatasheetpartid-323686-15189469.pdf?src-supplier=Verical, ComponentLink5URL=https://datasheet.ciiva.com/15189/getdatasheetpartid-323686-15189469.pdf?src-supplier=Verical, Construction=Rectangular, Depth=0.5mm, Features="Moisture Resistant", Height=0.016inch, Lead Free="Lead Free", Length=1mm, Manufacturer Part Number=RC0402FR-07499KL, Military Standard=Not, Number of Terminations=2, Packaging="Tape and Reel", Pricing 1="1=0.10000, 10=0.01200, 50=0.01200, 100=0.00500, 1000=0.00300, 2500=0.00200, 10000=0.00100 (USD)", RoHS=Yes, RoHS Compliant=Yes, Series=RC, Stock 1=718305, Supplier 1=Mouser, Technology="THICK FILM", Termination=SMD/SMT, Voltage Rating (DC)=50V, Width=0.02inch, Working Voltage=50V
R16: library part RC0805FR-071KL, "RES 1K OHM 1% 1/8W 0805", Case Code (Imperial)=0805, Case Code (Metric)=2012, LCSC Part Number=C95781, Manufacturer=Yageo, Max Operating Temperature=155°C, Max Power Dissipation=125mW, Min Operating Temperature=-55°C, Package Quantity=1, Resistance Tolerance=1%, Resistor Type="Thick Film", Supplier Part Number=8126013, Temperature Coefficient=100ppm/°C, Voltage Rating=150V, Case/Package=0805, Category="Chip SMD Resistors", ComponentLink1Description=https://datasheet.ciiva.com/7941/1686128-7941719.pdf?src-supplier=Element14, ComponentLink1URL=https://datasheet.ciiva.com/7941/1686128-7941719.pdf?src-supplier=Element14, ComponentLink2Description=https://datasheet.ciiva.com/46385/444164-46385020.pdf?src-supplier=Element14, ComponentLink2URL=https://datasheet.ciiva.com/46385/444164-46385020.pdf?src-supplier=Element14, ComponentLink3Description=https://datasheet.ciiva.com/2456/pyu-r-int-thick-7-2456976.pdf?src-supplier=Digi-Key, ComponentLink3URL=https://datasheet.ciiva.com/2456/pyu-r-int-thick-7-2456976.pdf?src-supplier=Digi-Key, ComponentLink4Description=https://datasheet.ciiva.com/2456/pyu-r-int-thick-7-2456977.pdf?src-supplier=Digi-Key, ComponentLink4URL=https://datasheet.ciiva.com/2456/pyu-r-int-thick-7-2456977.pdf?src-supplier=Digi-Key, ComponentLink5Description=https://datasheet.ciiva.com/2456/pyu-r-int-thick-7-2456975.pdf?src-supplier=Digi-Key, ComponentLink5URL=https://datasheet.ciiva.com/2456/pyu-r-int-thick-7-2456975.pdf?src-supplier=Digi-Key, ComponentLink6Description=https://datasheet.ciiva.com/16850/rc0805-16850409.pdf?src-supplier=Future+Electronics, ComponentLink6URL=https://datasheet.ciiva.com/16850/rc0805-16850409.pdf?src-supplier=Future+Electronics, Construction=Rectangular, Depth=1.25mm, Features="Moisture Resistant", Height=0.024inch, Item Type=Resistor, Lead Free=5697LeadFree, Length=0.079inch, Manufacturer Part Number=RC0805FR-071KL, Military Standard=Not, Number of Terminations=2, Packaging="Tape and Reel", Pins=2, Power Rating=125mW, Pricing="5000=0.117, 25000=0.112, 125000=0.107, 500000=0.104, 1250000=0.0981 (USD)", Reach SVHC Compliant=No, RoHS=Yes, RoHS Compliant=Yes, Series=RC, Stock=8305000, Supplier="Future Electronics", Termination=SMD/SMT, Tolerance=1%, Voltage Rating (AC)=150V, Voltage Rating (DC)=150V, Width=0.049inch
R17 R18 R19: library part RC0805FR-071ML, "RES 1M OHM 1% 1/8W 0805", Case Code (Imperial)=0805, Case Code (Metric)=2012, Case/Package=Molded, LCSC Part Number=C107700, Manufacturer=Yageo, Max Operating Temperature=155°C, Min Operating Temperature=-55°C, Power Rating=125mW, Resistance Tolerance=1%, Resistor Type="Thick Film", Supplier Part Number=7283393, Temperature Coefficient=250ppm/°C, Voltage Rating=150V, Category="Chip SMD Resistors", Construction=Rectangular, Depth=1.25mm, Item Type=Resistor, Lead Free="Lead Free", Length=2mm, Manufacturer Part Number=RC0805FR-071ML, Military Standard=Not, Packaging="Tape and Reel", Pricing="5000=0.0027, 25000=0.0025, 125000=0.0024, 500000=0.0023, 1250000=0.0021 (USD)", Reach SVHC Compliant=Unknown, RoHS=Yes, RoHS Compliant=Yes, Stock=2655000, Supplier="Future Electronics", Tolerance=1%, Voltage Rating (AC)=150V
R20: library part RC0805FR-070RL, "RES 0 OHM JUMPER 1/8W 0805", Case Code (Imperial)=0805, Case Code (Metric)=2012, LCSC Part Number=C100045, Manufacturer=Yageo, Max Operating Temperature=155°C, Max Power Dissipation=125mW, Min Operating Temperature=-55°C, Resistance=0mR, Resistor Type="Thick Film", Tolerance=1%, Case/Package=0805, Category="Chip SMD Resistors", ComponentLink1Description=https://datasheet.ciiva.com/15189/getdatasheetpartid-348154-15189885.pdf?src-supplier=Verical, ComponentLink1URL=https://datasheet.ciiva.com/15189/getdatasheetpartid-348154-15189885.pdf?src-supplier=Verical, ComponentLink2Description=https://datasheet.ciiva.com/17042/rc0805-17042698.pdf?src-supplier=Future+Electronics, ComponentLink2URL=https://datasheet.ciiva.com/17042/rc0805-17042698.pdf?src-supplier=Future+Electronics, Construction=Rectangular, Contact Plating=Tin,Matte, Depth=1.25mm, Features="Moisture Resistant", Item Type=Resistor, Lead Free="Lead Free", Length=2mm, Manufacturer Part Number=RC0805FR-070RL, Military Standard=Not, Number of Terminations=2, Packaging="Tape and Reel", Power Rating=125mW, Pricing 1="5000=0.00281, 10000=0.00277, 20000=0.00269 (USD)", Radiation Hardening=No, RoHS=Yes, RoHS Compliant=Yes, Series=RC, Size Code=0805, Stock 1=85000, Supplier 1=Avnet, Supplier Part Number 1=RC0805FR-070RL
R22 R23 R24 R25: library part RC0201FR-074K7L, "RES 4.7K OHM 1% 1/20W 0201", LCSC Part Number=C138135, Manufacturer=Yageo, Supplier Part Number=7537285, Category="Chip SMD Resistors", ComponentLink1Description=https://datasheet.ciiva.com/2493/pyu-r-int-thick-7-2493811.pdf?src-supplier=Digi-Key, ComponentLink1URL=https://datasheet.ciiva.com/2493/pyu-r-int-thick-7-2493811.pdf?src-supplier=Digi-Key, ComponentLink2Description=https://datasheet.ciiva.com/2493/pyu-r-int-thick-7-2493812.pdf?src-supplier=Digi-Key, ComponentLink2URL=https://datasheet.ciiva.com/2493/pyu-r-int-thick-7-2493812.pdf?src-supplier=Digi-Key, ComponentLink3Description=https://datasheet.ciiva.com/2493/pyu-r-int-thick-7-2493813.pdf?src-supplier=Digi-Key, ComponentLink3URL=https://datasheet.ciiva.com/2493/pyu-r-int-thick-7-2493813.pdf?src-supplier=Digi-Key, ComponentLink4Description=https://datasheet.ciiva.com/8892/pyu-rc0201-51-rohs-l-8-8892942.pdf?src-supplier=Avnet, ComponentLink4URL=https://datasheet.ciiva.com/8892/pyu-rc0201-51-rohs-l-8-8892942.pdf?src-supplier=Avnet, ComponentLink5Description=https://datasheet.ciiva.com/7672/1563626-7672233.pdf?src-supplier=Element14, ComponentLink5URL=https://datasheet.ciiva.com/7672/1563626-7672233.pdf?src-supplier=Element14, Item Type=Resistor, Manufacturer Part Number=RC0201FR-074K7L, Pricing="10000=0.0014, 50000=0.0013, 250000=0.0013, 750000=0.0012, 2000000=0.0011 (USD)", RoHS=Yes, Stock=1610000, Supplier="Future Electronics"
SB1 SB2 SB3 SB4 SB5 SB6 SB7: "Solder Bridge ON", Item Type="Solder Bridge", Manufacturer Part Number="Solder Bridge 0402"
U1: "IC BATT MON MULTI 3-5C 20TSSOP", Manufacturer="Texas Instruments", Supplier Part Number=595-BQ7692006PWR, Category="Battery Management", ComponentLink1Description=https://datasheet.ciiva.com/48478/bq76920-48478374.pdf?src-supplier=Avnet, ComponentLink1URL=https://datasheet.ciiva.com/48478/bq76920-48478374.pdf?src-supplier=Avnet, Manufacturer Part Number=BQ7692006PWR, Pricing="1=3.26, 10=2.77, 50=2.77, 100=2.41, 1000=1.73, 10000=1.53 (USD)", RoHS=Yes, Stock=12739, Supplier=Mouser
U2: "IC MCU 8BIT 16KB FLASH 20VQFN", LCSC Part Number=C507118, Manufacturer="Microchip Tech", Package=QFN-20-EP(3x3), ComponentLink1Description=LCSC, ComponentLink1URL=https://www.lcsc.com/product-detail/Microcontroller-Units-MCUs-MPUs-SOCs_Microchip-Tech-ATTINY1616-MNR_C507118.html, Item Type=IC, Manufacturer Part Number=ATTINY1616-MNR

## Free pads (board coordinates)
  round 82.68 hole 82.68 unplated: MH(0,1418.2) MH(1,0) MH(1418.2,1419.2) MH(1419.2,1)

## Via types
v1: diameter 23.62, hole 11.81, Top Layer to Bottom Layer, tented both sides, 110 vias

## Nets (pads, with @x,y where several pads share a name; then routed paths per layer and width w, separated by ;. In a path a pad name is that pad's centre, name@x,y a point inside that pad or via, vN(x,y) a via of type N, cw(c..) or ccw(c..) an arc to the next point about the centre after c; other vN are vias at no path point)
3V3: C8.2 R9.2 R10.2 R22.2 R23.2 R24.2 R25.2 R26.2 R27.2 SB5.1 U1.8 | length 1003.4
  Top Layer w10: 1135.69,522.2 R25.2
  Top Layer w15: v1@921.24,346.28 v1(921.35,346.39)
  Top Layer w20: SB5.1@966.2,138.31 v1(966.2,160.74)
  Top Layer w25: v1(934.36,522.2) 1135.69,522.2
  Bottom Layer w20: v1(934.36,522.2) 895.46,522.2 883.74,510.48 883.74,358.11 895.46,346.39 v1(921.35,346.39) 1099.45,346.39 1119.83,326.01 1119.83,239.38 1098.67,218.22 v1(1043.2,218.22) 985.67,218.22 966.2,198.75 v1(966.2,160.74)
#BATT_P: C7.2 R7.2 U1.9 U1.10
#DSG: C16.2 Q1.3 R12.1 R13.2 R19.1 | length 271
  Top Layer w20: R13.2@599.2,865.58 599.2,753.76 618.8,734.15 R12.1@750.22,734.15
#SCL: CON1.2 CON2.2 R26.1 U2.14 | length 1427.9
  Top Layer w8: v1(1025.2,383.37) 1025.2,357.78 1037.2,345.78 U2.14
  Top Layer w15: v1(1025.2,383.37) R26.1 ; CON2.2 1238.7,703.69 1223.2,719.2 1223.2,983.12 1238.28,998.2 1359.2,998.2 1375.2,1014.2 1375.2,1070.23 1360.73,1084.69 CON1.2
  Top Layer w25: CON2.2 v1(1355.1,703.69)
  Bottom Layer w15: v1(1025.2,383.37) 1025.2,575.89 1153,703.69 v1(1355.1,703.69)
#SDA: CON1.1 CON2.1 R27.1 U2.13 | length 1194.2
  Top Layer w8: v1(1063.8,383.37) 1065.79,381.39 1065.79,367.68 1071.93,361.53 U2.13
  Top Layer w15: v1(1063.8,383.37) R27.1 ; 1269.47,1034.2 1221.8,1034.2 1194.07,1006.47 1194.07,680.33 1219.92,654.48 CON2.1
  Top Layer w25: CON2.1 v1(1355.1,654.48)
  Bottom Layer w15: v1(1063.8,383.37) 1063.8,562.28 1156,654.48 v1(1355.1,654.48)
ADD1: R22.1 SB1.1 U2.5 | length 393.8
  Top Layer w8: U2.5 1225.65,432.48 1248.03,454.86 R22.1@1248.03,477.29
  Top Layer w10: R22.1 1248.03,477.29 1250.32,475.01 1393.63,475.01 1414.7,453.94 SB1.1
ADD2: R23.1 SB2.1 U2.6 | length 404.1
  Top Layer w8: U2.6 1202.03,448.34 v1(1217.03,463.34)
  Top Layer w20: v1(1396.74,296.21) 1397.1,295.85 SB2.1@1412.47,295.85
  Bottom Layer w15: v1(1217.03,463.34) 1377.13,463.34 1396.74,443.73 v1(1396.74,296.21)
ADD3: R24.1 SB3.1 U2.7 | length 540.7
  Top Layer w8: v1@1185.72,464.27 1186,463.99 1186,416.93 U2.7 ; R24.1@1185.72,481.05 R24.1
  Top Layer w20: v1(1396.74,259.01) 1397.1,258.65 SB3.1@1412.1,258.65
  Bottom Layer w10: v1(1185.72,463.34) 1185.72,481.88 1193.63,489.79 1386.6,489.79 1419.87,456.52 1419.87,282.15 v1(1396.74,259.01)
ADD4: R25.1 SB4.1 U2.8 | length 670.1
  Top Layer w8: v1(1154.8,463.34) 1170.54,447.6 U2.8
  Top Layer w20: v1(1396.74,219.56) 1397.1,219.2 SB4.1@1411.54,219.2
  Bottom Layer w10: v1(1154.8,463.34) 1154.87,463.41 1154.87,493.64 1170.75,509.52 1394.33,509.52 1438.53,465.31 1438.53,261.35 v1(1396.74,219.56)
ALERT: C14.2 R15.2 U1.20 U2.17 | length 774.8
  Top Layer w8: v1(1138.06,212.2) 1138.06,212.41 1154.79,229.14 U2.17
  Top Layer w15: v1(583.2,78.2) v1@583.38,78.38 ; R15.2@611.63,78.38 R15.2
  Top Layer w20: v1@583.38,78.38 R15.2@611.63,78.38
  Bottom Layer w15: v1(583.2,78.2) 604.23,99.23 1024.05,99.23 1039.52,114.69 1039.52,176.14 1053.63,190.25 1116.11,190.25 v1@1137.04,211.18
BATT_N: D3.1 J1.1 NT1.1 R1.1 R11.1 R13.1 | length 273.1
  Top Layer w20: R13.1@392.2,538.81 R13.1@395.19,541.81 ; R13.1@599.2,538.81 599.2,648.06 618.28,667.15 R11.1@750.86,667.15
  other v1: 267.2,90.91 300.25,90.91 267.2,115.01 300.25,115.01
BATT_P: C17.2 D1.1 D3.2 D4.3 J2.1 J7.1 J8.1 R6.1 R8.1
  other v1: 175.7,420.47 210.2,420.47 244.7,420.47 175.7,447.2 210.2,447.2 244.7,447.2 685.07,507.2 685.07,538.81
BOOT: R14.2 U2.18 | length 348.4
  Top Layer w8: R14.2 987.2,197.92 998.72,186.4 1159.43,186.4 1170.54,197.51 U2.18
C1: CON4.4 R2.1
C2: CON4.3 R3.1
C3: CON4.2 R4.1
C4: CON4.1 R5.1
CAP1: C9.2 U1.7 | length 133.6
  Top Layer w8: U1.7 981.63,320.58 987.2,326.15 C9.2
CHG: Q3.2 U1.2 | length 1393.9
  Top Layer w15: v1(829.3,192.63) U1.2
  Bottom Layer w15: v1@616.23,1366.42 718.98,1366.42 757.84,1327.56 757.84,220.56 785.76,192.63 v1(829.3,192.63)
  other v1: 617.89,1366.42
DSG: R20.1 U1.1 | length 1228
  Top Layer w15: v1(811.78,167.04) U1.1
  Top Layer w25: R20.1 v1(610.2,1139.2)
  Bottom Layer w15: v1(610.2,1139.2) 699.7,1139.2 731.04,1107.86 731.04,211.41 775.41,167.04 v1(811.78,167.04)
GND: C1.2 C2.2 C7.1 C8.1 C9.1 C10.1 C12.2 C13.2 C14.1 C19.1 C20.1 CON1.3 CON1.MP1 CON1.MP2 CON2.3 CON2.MP1 CON2.MP2 CON3.2 CON3.MP1 CON3.MP2 NT1.2 NTC.2 Q3.1 R15.1 SB1.2 SB2.2 SB3.2 SB4.2 U1.3 U2.3 U2.21 | length 397.2
  Top Layer w10: C13.2 C13.2@893.19,794.2 ; C7.1@954.02,451.91 C7.1
  Top Layer w15: R15.1 659.38,41.56 672.2,54.38 C14.1 C14.1@672.28,122.12 ; 621.7,20.58 621.81,20.7
  Top Layer w20: 492.2,20.14 C19.1@492.2,39.14 ; 502.2,20.14 502.39,19.95 ; 611.81,20.7 R15.1@611.81,39.15 ; v1(1143.2,63.2) CON3.2
  Top Layer w25: C12.2 v1(928.7,608.2) ; C13.2@892.92,792.48 893.64,793.2 v1(928.7,793.2) ; CON2.3 v1(1355.1,752.9) ; CON1.3 1355.1,1133.9